# Altium PCB Bento Pad V1.0_PCB.PcbDoc (part 3 of 3)
Units mil, origin at the board's own origin, x right, y up, seen from the top; angles counter-clockwise.
Board outline 10000 x 3200 mil, 2 copper layers (Top Layer, Bottom Layer), stack 61.811 mil thick; 125 components, 53 nets, 479 pads, 91 vias.
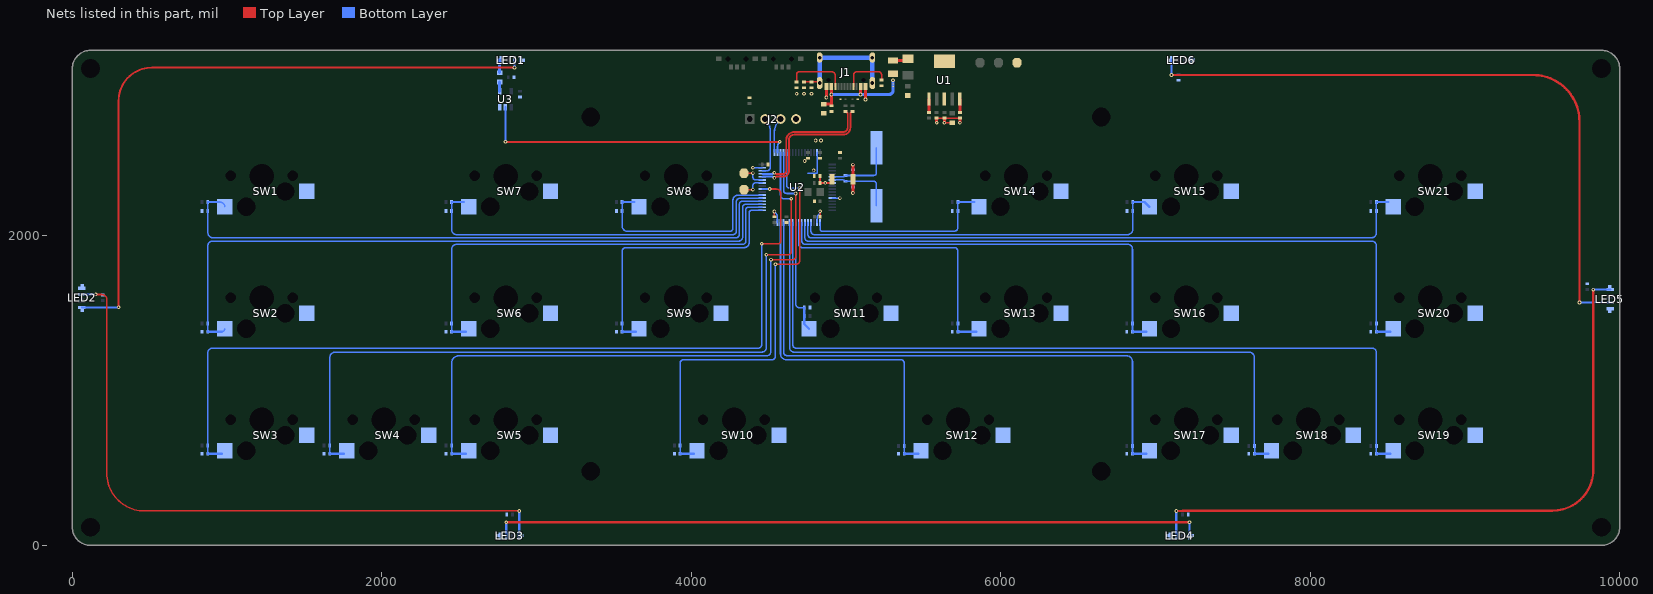
[diagram p2: the nets of this part, all layers, seen from the top]

## Via types
v1: diameter 23.62, hole 11.81, Top Layer to Bottom Layer, tented both sides, 91 vias

## Nets (pads, with @x,y where several pads share a name; then routed paths per layer and width w, separated by ;. In a path a pad name is that pad's centre, name@x,y a point inside that pad or via, vN(x,y) a via of type N, cw(c..) or ccw(c..) an arc to the next point about the centre after c; other vN are vias at no path point) (continued)
GND: C1.1 C2.2 C3.2 C4.1 C5.1 C6.1 C7.1 C8.1 C9.2 C10.2 C11.2 C12.2 C13.1 C14.2 C15.1 C16.2 C17.1 C18.1 C19.1 C20.1 C21.1 C22.1 C23.1 C24.1 C25.1 C26.1 C27.1 C28.1 C29.1 C30.1 C31.1 C32.1 C33.1 C34.1 C35.1 C36.1 C37.1 C38.1 C39.1 C40.1 C41.1 C42.1 C43.1 C44.2 C45.1 C46.1 D1.2 D2.2 D3.2 J1.A1/B12 J1.B1/A12 J2.4 LED1.4 LED2.4 LED3.4 LED4.4 LED5.4 LED6.4 P3.1 R1.2 R2.2 R3.2 R9.2 R10.1 SW1.1 SW2.1 SW3.1 SW4.1 SW5.1 SW6.1 SW7.1 SW8.1 SW9.1 SW10.1 SW11.1 SW12.1 SW13.1 SW14.1 SW15.1 SW16.1 SW17.1 SW18.1 SW19.1 SW20.1 SW21.1 SW22.2 U1.3 U1.6 U2.12 U2.18 U2.31 U2.47 U2.63 U3.3 | length 1221.9
  Top Layer w10: C11.2@4537.4,2124.09 v1(4537.4,2158) ; C9.2@4832.68,2124.09 v1(4832.68,2159.92) ; J1.B1/A12@4873.65,2965.62 J1.B1/A12@4874.02,2965.98 ; C5.1@5586,2761.75 C5.1@5593.5,2761.75 ; C5.1@5593.5,2760.75 C7.1@5736,2760.75 ; v1(5636,2732.25) C8.1@5686,2732.25
  Top Layer w20: v1@4873.64,2895 J1.B1/A12@4873.64,2965.61 ; v1(5044.71,2278.03) SW22.2@5044.71,2366.01 v1(5044.71,2461.1) ; v1(5125.99,2882.19) J1.A1/B12@5125.98,2965.98 ; v1(5586,2732.25) C5.1@5586,2758.75 ; v1(5636,2732.25) C6.1@5636,2758.75 ; v1(5736,2732.25) C7.1@5736,2758.75
  Bottom Layer w10: LED3.4@2764.73,61.5 LED3.4@2765,61.5 ; v1(4398.48,2441.42) U2.47@4458.66,2441.42 ; v1(4537.4,2158) 4547.24,2148.16 cw(c4523.48,2124.4) 4557.09,2124.4 U2.31@4557.09,2087.09 ; 4753.94,2404.33 4812.99,2404.33 U2.63@4812.99,2539.84 ; U2.18@4812.99,2087.09 4812.99,2128.04 4830.07,2145.12 4830.07,2157.31 v1(4832.68,2159.92) ; U2.12@4911.42,2244.57 v1(4960.33,2244.57) ; v1(5044.71,2278.03) C15.1@5044.71,2317.02 ; C13.1@5044.71,2428.02 v1(5044.71,2461.1)
  other v1: 4790.68,2423.96 4732.73,2484.19 4803.6,2616.73 4838.27,2616.73 4873.27,2895 4680.82,2919.65 4728.9,2919.65 4776.9,2919.65
LDO_EN: R6.1 U1.1 | length 83.8
  Top Layer w20: R6.1@5536,2802.12 U1.1@5536,2885.95
LED_DO_3V3: U2.50 U3.2 | length 2070.3
  Top Layer w12: v1(2799.5,2608.5) 4571.5,2608.5 v1(4572,2609)
  Bottom Layer w12: U3.2@2798.86,2832.64 2799.18,2832.32 2799.18,2608.82 v1(2799.5,2608.5) ; U2.50@4557.09,2539.84 4557.09,2573 cw(c4608,2573) 4563.05,2596.9 cw(c4608,2573) v1(4572,2609)
LED_DO_5V0: R33.1 U3.4 | length 60.5
  Bottom Layer w20: U3.4@2761.46,2935 R33.1@2761.46,2995.53
NetC1_2: C1.2 J1.S1 J1.S2 J1.S3 J1.S4 R1.1 | length 780.2
  Top Layer w10: R1.1@4728.9,2995.35 4812.8,2995.35 cw(c4812.8,2978.43) J1.S1@4829.72,2978.43
  Bottom Layer w30: J1.S1@4829.72,2988.43 J1.S2@4829.72,3152.99 J1.S3@5170.28,3152.99 J1.S4@5170.28,2988.43
NetC7_2: C7.2 U1.5 | length 84.1
  Top Layer w20: C7.2@5736,2801.89 U1.5@5736,2885.95
NetF1_2: F1.2 FB1.1 | length 101.8
  Top Layer w20: F1.2@5304,3135.31 5389.76,3135.31 ccw(c5389.76,3145.54) FB1.1@5400,3145.54
NetJ1_A5: J1.A5 R2.1 | length 311.8
  Top Layer w10: J1.A5@5049.21,2965.98 5049.21,3040.21 cw(c5071.01,3040.21) 5071.01,3062.01 5208.61,3062.01 cw(c5208.61,3040.62) 5230,3040.62 R2.1@5230,3008.5
NetJ1_B5: J1.B5 R3.1 | length 393.9
  Top Layer w10: R3.1@4680.82,2995.35 4680.82,3043 cw(c4699.83,3043) 4699.83,3062.01 4905.51,3062.01 cw(c4905.51,3036.52) 4931,3036.52 4931,3019 4931.1,3019 J1.B5@4931.1,2965.98
NetLED1_1: LED1.1 R33.2 | length 92.8
  Bottom Layer w10: LED1.1@2761.5,3135.47 cw(c2764.53,3135.47) 2764.53,3138.5 LED1.1@2772.64,3138.5
  Bottom Layer w20: R33.2@2761.5,3055.56 LED1.1@2761.5,3135.47
NetLED1_3: LED1.3 LED2.1 | length 4303.7
  Top Layer w12: v1(299.31,1539) 299.31,2873.72 cw(c513.6,2873.72) 513.6,3088 v1(2857.28,3088)
  Bottom Layer w12: LED2.1@61.5,1537.99 62,1538.5 298.81,1538.5 v1(299.31,1539) ; v1(2857.28,3088) LED1.3@2857.28,3138.5
NetLED2_3: LED2.3 LED3.1 | length 4269.8
  Top Layer w10: v1(151.5,1622.64) ccw(c152.35,1622.64) 152.35,1621.78 191.14,1621.78 cw(c191.14,1589.92) 223,1589.92 223,466.73 ccw(c466.54,466.73) 466.54,223.19 v1(2888.75,223.19)
  Bottom Layer w15: LED2.3@61.5,1622.64 v1(151.5,1622.64) ; LED3.1@2888.75,61.5 v1(2888.75,223.19)
NetLED3_3: LED3.3 LED4.1 | length 4592.2
  Top Layer w15: v1(2804.1,149.85) v1(7219.45,149.85) v1@7219.45,150
  Bottom Layer w15: LED3.3@2804.1,61.5 v1(2804.1,149.85) ; LED4.1@7219.45,61.5 v1(7219.45,149.85)
NetLED4_3: LED4.3 LED5.1 | length 4281
  Top Layer w15: v1(7134.81,223.19) 7175.97,224.99 cw(c7176.62,210) 7176.62,225 9565.55,225 ccw(c9565.55,488.78) 9829.33,488.78 v1(9829.33,1653.57)
  Bottom Layer w15: LED4.3@7134.81,61.5 v1(7134.81,223.19) ; v1(9829.33,1653.57) 9829.6,1653.83 9938.24,1653.83 LED5.1@9938.5,1654.1
NetLED5_3: LED5.3 LED6.1 | length 4275.3
  Top Layer w15: v1(7103.35,3040.15) 9440.43,3040.15 cw(c9440.43,2740.58) 9740,2740.58 v1(9740,1570)
  Bottom Layer w15: v1(7103.35,3040.15) LED6.1@7103.35,3138.5 ; v1(9740,1570) 9740.27,1569.73 9938.23,1569.73 LED5.3@9938.5,1569.45
OSC_IN: C13.2 R7.1 U2.5 X1.1 | length 458.9
  Bottom Layer w10: U2.5@4911.42,2382.36 4976.81,2382.36 ccw(c4976.81,2411.92) R7.1@4997.71,2391.02 C13.2@5044.71,2391.02 5178.91,2391.02 ccw(c5178.91,2408.96) 5196.85,2408.96 X1.1@5196.85,2569.84
OSC_OUT: C15.2 R7.2 U2.6 X1.2 | length 437.6
  Bottom Layer w10: U2.6@4911.42,2362.68 4976.81,2362.68 cw(c4976.81,2333.12) R7.2@4997.71,2354.02 C15.2@5044.71,2354.02 5177.41,2354.02 cw(c5177.41,2334.58) 5196.85,2334.58 X1.2@5196.85,2195.83
RST: C16.1 R8.1 SW22.1 U2.7 | length 188.5
  Top Layer w15: C16.1@4831.49,2388.27 R8.1@4831.49,2342.99 4902.21,2342.99 4910.85,2351.63 SW22.1@4910.85,2366.01
  Bottom Layer w10: v1(4865.48,2342.99) U2.7@4911.42,2342.99
RX: P5.1 U2.43 | length 154.5
  Top Layer w10: P5.1@4341,2405.68 4341,2406.05 v1(4398.48,2406.05)
  Bottom Layer w10: v1(4398.48,2406.05) 4398.48,2378.76 ccw(c4414.56,2378.76) 4414.56,2362.68 U2.43@4458.66,2362.68
SW#1: C23.2 R13.2 SW1.2 U2.36 | length 4143.9
  Bottom Layer w10: R13.2@876,2219.22 C23.2@876,2161.22 876,2022.51 ccw(c910.36,2022.51) 910.36,1988.15 4287.2,1988.15 ccw(c4287.2,2012.17) 4311.22,2012.17 4311.22,2205.2 cw(c4330.91,2205.2) 4330.91,2224.88 U2.36@4458.66,2224.88 ; SW1.2@954.21,2219.22 cw(c954.21,2188.19) SW1.2@985.24,2188.19
  Bottom Layer w15: R13.2@876,2219.22 SW1.2@954.21,2219.22
SW#2: C24.2 R14.2 SW2.2 U2.35 | length 4494.6
  Bottom Layer w10: C24.2@876,1381 R14.2@876,1434 876,1936.23 cw(c906.99,1936.23) 906.99,1967.22 4307.51,1967.22 ccw(c4307.51,1991.86) 4332.15,1991.86 4332.15,2185.51 cw(c4351.83,2185.51) 4351.83,2205.2 U2.35@4458.66,2205.2 ; SW2.2@966.24,1381 ccw(c966.24,1400) SW2.2@985.24,1400
  Bottom Layer w15: C24.2@876,1381 SW2.2@966.24,1381
SW#3: C25.2 R15.2 SW3.2 U2.40 | length 5581.3
  Top Layer w10: v1(4455,1950) 4562,1950 ccw(c4562,1966) 4578,1966 4578,2275.44 ccw(c4549.9,2275.44) 4549.9,2303.54 v1(4507.64,2303.54)
  Bottom Layer w10: C25.2@875.98,592.81 R15.2@875.98,645 875.98,1245.98 cw(c905,1245.98) 905,1275 4432.31,1275 ccw(c4432.31,1297.69) 4455,1297.69 v1(4455,1950) ; U2.40@4458.66,2303.62 4507.64,2303.62 v1(4507.64,2303.54)
  Bottom Layer w15: C25.2@875.98,592.81 SW3.2@966.22,592.81
SW#4: C26.2 R16.2 SW4.2 U2.51 | length 5043.7
  Top Layer w10: v1(4485.45,1878.27) 4625.45,1878.27 ccw(c4625.45,1899.55) 4646.73,1899.55 v1(4646.73,2241.1)
  Bottom Layer w10: C26.2@1664.17,592.81 R16.2@1664.17,645 1664.17,1214.17 cw(c1700,1214.17) 1700,1250 4456.07,1250 ccw(c4456.07,1279.38) 4485.45,1279.38 v1(4485.45,1878.27) ; U2.51@4576.77,2539.84 4576.77,2262.03 ccw(c4597.7,2262.03) 4597.7,2241.1 v1(4646.73,2241.1)
  Bottom Layer w15: C26.2@1664.17,592.81 SW4.2@1754.4,592.81
SW#5: C27.2 R11.2 SW5.2 U2.52 | length 4287.2
  Top Layer w10: v1(4515,1847.16) 4657.16,1847.16 ccw(c4657.16,1864.27) 4674.27,1864.27 v1(4674.27,2274.57)
  Bottom Layer w10: C27.2@2452.36,592.81 R11.2@2452.36,645 2452.36,1182.36 cw(c2495,1182.36) 2495,1225 4485.33,1225 ccw(c4485.33,1254.67) 4515,1254.67 v1@4515,1844.16 ; U2.52@4596.46,2539.84 4596.46,2294.25 ccw(c4616.14,2294.25) 4616.14,2274.57 v1(4674.27,2274.57)
  Bottom Layer w15: C27.2@2452.36,592.81 SW5.2@2542.59,592.81
SW#6: C28.2 R17.2 SW6.2 U2.34 | length 2879.9
  Bottom Layer w10: C28.2@2451.38,1375 C28.2@2451.38,1381 R17.2@2451.38,1434 2451.38,1914.38 cw(c2483.3,1914.38) 2483.3,1946.3 4333.21,1946.3 ccw(c4333.21,1966.17) 4353.07,1966.17 4353.07,2171.73 cw(c4366.85,2171.73) 4366.85,2185.51 U2.34@4458.66,2185.51
  Bottom Layer w15: C28.2@2452.38,1381 SW6.2@2542.61,1381
SW#7: C29.2 R12.2 SW7.2 U2.37 | length 2497.8
  Bottom Layer w10: R12.2@2451.38,2219.22 C29.2@2451.38,2161.22 2451.38,2041.21 ccw(c2483.51,2041.21) 2483.51,2009.07 4270.34,2009.07 ccw(c4270.34,2029.04) 4290.3,2029.04 4290.3,2218.98 cw(c4315.89,2218.98) 4315.89,2244.57 U2.37@4458.66,2244.57
  Bottom Layer w15: R12.2@2452.38,2219.22 SW7.2@2530.59,2219.22
SW#8: C30.2 R18.2 SW8.2 U2.38 | length 1377.1
  Bottom Layer w10: R18.2@3552.96,2226.76 R18.2@3552.96,2219.22 C30.2@3552.96,2161.22 3552.96,2064.93 ccw(c3587.89,2064.93) 3587.89,2030 4249.68,2030 ccw(c4249.68,2049.69) 4269.37,2049.69 4269.37,2230.79 cw(c4302.84,2230.79) 4302.84,2264.25 U2.38@4458.66,2264.25
  Bottom Layer w15: R18.2@3552.96,2219.22 SW8.2@3631.17,2219.22
SW#9: C31.2 R19.2 SW9.2 U2.33 | length 1749.7
  Bottom Layer w10: C31.2@3552.96,1381 R19.2@3552.96,1434 3552.96,1900.19 cw(c3578.15,1900.19) 3578.15,1925.37 4342.6,1925.37 ccw(c4342.6,1956.77) 4374,1956.77 4374,2150.02 cw(c4389.81,2150.02) 4389.81,2165.83 U2.33@4458.66,2165.83
  Bottom Layer w15: C31.2@3552.96,1381 SW9.2@3643.2,1381
SW#10: C32.2 R20.2 SW10.2 U2.53 | length 2852.5
  Top Layer w10: v1(4544.14,1817.35) 4676.96,1817.35 ccw(c4676.96,1841.47) 4701.08,1841.47 v1(4701.08,2309.92)
  Bottom Layer w10: C32.2@3927.94,592.81 R20.2@3927.94,645 3927.94,1177.94 cw(c3950,1177.94) 3950,1200 4520,1200 ccw(c4520,1224.14) 4544.14,1224.14 v1(4544.14,1817.35) ; U2.53@4616.14,2539.84 4616.14,2327.72 ccw(c4633.94,2327.72) 4633.94,2309.92 v1@4696.08,2309.92
  Bottom Layer w15: C32.2@3927.94,592.81 SW10.2@4018.18,592.81
SW#11: C33.2 R26.2 SW11.2 U2.25 | length 745.3
  Bottom Layer w10: U2.25@4675.2,2087.09 4675.2,1561.8 ccw(c4701,1561.8) 4701,1536 4728.67,1536 ccw(c4728.67,1537.11) C33.2@4729.78,1537.11
  Bottom Layer w15: C33.2@4729.78,1537.11 R26.2@4729.78,1484.11 4729.78,1431.38 SW11.2@4761.16,1400
SW#12: C34.2 R27.2 SW12.2 U2.30 | length 2354.4
  Bottom Layer w10: U2.30@4576.77,2087.09 4576.77,1237.46 ccw(c4613.23,1237.46) 4613.19,1201 ; 4613.23,1201 5353.92,1201 cw(c5353.92,1178.94) 5375.98,1178.94 R27.2@5375.98,646 ; C34.2@5375.98,593.81 R27.2@5375.98,642.81
  Bottom Layer w15: C34.2@5375.98,592.81 SW12.2@5466.22,592.81
SW#13: C35.2 R28.2 SW13.2 U2.24 | length 1833.2
  Bottom Layer w10: U2.24@4694.88,2087.09 4694.88,1946.3 ccw(c4715.81,1946.3) 4715.81,1925.37 4864.94,1925.37 5699.02,1925.37 cw(c5699.02,1901.39) 5723,1901.39 R28.2@5723,1434 C35.2@5723,1381
  Bottom Layer w15: C35.2@5723,1381 SW13.2@5841.24,1381
SW#14: C36.2 R23.2 SW14.2 U2.17 | length 1225.7
  Bottom Layer w10: U2.17@4832.68,2087.09 4832.68,2044.68 ccw(c4847.36,2044.68) 4847.36,2030 4873.42,2030 5656.71,2030 5697.82,2030 ccw(c5697.82,2055.18) 5723,2055.18 R23.2@5723,2219.22
  Bottom Layer w15: R23.2@5723,2219.22 5724.41,2219.22 SW14.2@5829.21,2219.22
SW#15: C37.2 R21.2 SW15.2 U2.20 | length 2465.4
  Bottom Layer w10: U2.20@4773.62,2087.09 4773.62,2030 ccw(c4794.55,2030) 4794.55,2009.07 4838.58,2009.07 6820.45,2009.07 ccw(c6820.45,2041.21) 6852.58,2041.21 C37.2@6852.58,2161.22 R21.2@6852.58,2219.22
  Bottom Layer w15: R21.2@6852.58,2219.22 6929.79,2219.22 SW15.2@6960.82,2188.19
SW#16: C38.2 R24.2 SW16.2 U2.23 | length 2911.1
  Bottom Layer w10: U2.23@4714.57,2087.09 4714.57,1967.22 ccw(c4735.49,1967.22) 4735.49,1946.3 4856.45,1946.3 6820.66,1946.3 cw(c6820.66,1915.38) 6851.58,1915.38 R24.2@6851.58,1434 C38.2@6851.58,1381
  Bottom Layer w15: C38.2@6851.58,1381 SW16.2@6941.82,1381
SW#17: C39.2 R22.2 SW17.2 U2.29 | length 3812.7
  Bottom Layer w10: 4596.46,1252.24 ccw(c4623.7,1252.24) 4623.7,1225 6816,1225 cw(c6816,1189.44) 6851.56,1189.44 R22.2@6851.56,642.81 C39.2@6851.56,592.81 ; 4596.46,1252.29 U2.29@4596.46,2087.09
  Bottom Layer w15: C39.2@6851.56,592.81 SW17.2@6941.8,592.81
SW#18: C40.2 R29.2 SW18.2 U2.27 | length 4560.6
  Bottom Layer w10: 4635.83,1277.22 ccw(c4663.5,1277.22) 4666.33,1249.69 4669.33,1250 7603.92,1250 cw(c7603.92,1214.15) 7639.77,1214.15 R29.2@7639.77,642.81 ; 4635.83,1277.26 U2.27@4635.83,2087.09 ; C40.2@7640.79,592.81 R29.2@7640.79,642.81
  Bottom Layer w15: C40.2@7640.79,592.81 SW18.2@7730.01,592.81
SW#19: C41.2 R30.2 SW19.2 U2.26 | length 5334.6
  Bottom Layer w10: 4655.51,1297.91 ccw(c4678.43,1297.91) 4678.43,1275 8398.92,1275 cw(c8398.92,1245.98) 8427.94,1245.98 R30.2@8427.94,641.81 C41.2@8427.94,592.81 ; 4655.51,1297.96 U2.26@4655.51,2087.09
  Bottom Layer w15: C41.2@8427.94,592.81 SW19.2@8518.18,592.81
SW#20: C42.2 R31.2 SW20.2 U2.22 | length 4467.7
  Bottom Layer w10: U2.22@4734.25,2087.09 4734.25,1988.15 ccw(c4755.18,1988.15) 4755.18,1967.22 4856.45,1967.22 8396.97,1967.22 cw(c8396.97,1936.23) 8427.96,1936.23 R31.2@8427.96,1434 C42.2@8427.96,1381
  Bottom Layer w15: C42.2@8427.96,1381 SW20.2@8518.2,1381
SW#21: C43.2 R25.2 SW21.2 U2.21 | length 4052.5
  Bottom Layer w10: U2.21@4753.94,2087.09 4753.94,2009.07 ccw(c4774.86,2009.07) 4774.86,1988.15 4856.45,1988.15 8393.6,1988.15 ccw(c8393.6,2022.51) 8427.96,2022.51 C43.2@8427.96,2161.22 R25.2@8427.96,2213.22
  Bottom Layer w15: R25.2@8427.96,2219.22 SW21.2@8506.17,2219.22
SWDCLK: J2.3 U2.49 | length 228.3
  Bottom Layer w10: U2.49@4537.4,2539.84 4537.4,2674.48 cw(c4637.4,2674.48) 4566.69,2745.19 J2.3@4577.4,2755.91
SWDIO: J2.2 U2.46 | length 386.1
  Bottom Layer w10: U2.46@4458.66,2421.73 4490,2421.73 ccw(c4490,2441.73) 4510,2441.73 4510,2681.89 ccw(c4410,2681.89) 4480.71,2752.6 J2.2@4477.4,2755.91
TX: P4.1 U2.42 | length 154.5
  Top Layer w10: P4.1@4341,2299.25 4398.48,2299.25 v1(4398.48,2299.62)
  Bottom Layer w10: v1(4398.48,2299.62) 4398.48,2326.91 cw(c4414.56,2326.91) 4414.56,2342.99 U2.42@4458.66,2342.99
USB_D_N: R4.2 U2.44 | length 951.5
  Top Layer w12: v1(4537.4,2375.39) 4545.74,2381.43 cw(c4552.78,2371.7) 4552.78,2383.7 4572,2383.7 4594.79,2383.7 ccw(c4594.79,2419.91) 4631,2419.91 4631,2620.1 cw(c4665.9,2620.1) 4665.9,2655 4982,2655 ccw(c4982,2701.13) 5028.13,2701.13 5028.13,2786.09 cw(c5047.17,2786.09) 5033.71,2799.55 cw(c5037.22,2796.04) 5037.22,2801 ccw(c5037.22,2805.96) 5040.72,2802.45 R4.2@5042.27,2804
  Bottom Layer w12: U2.44@4458.66,2382.36 4458.76,2382.41 cw(c4464.18,2371.7) 4464.18,2383.7 ccw(c4464.18,2400.7) 4464.26,2383.7 4522.03,2383.7 cw(c4522.03,2371.7) 4529.06,2381.43 v1(4537.4,2375.39)
USB_D_P: R5.2 U2.45 | length 924.8
  Top Layer w12: v1(4537.4,2409.02) 4545.74,2402.98 ccw(c4552.78,2412.7) 4552.78,2400.7 cw(c4552.78,2383.7) 4552.83,2400.7 4594.7,2400.7 ccw(c4594.7,2420) 4614,2420 4614,2620.1 cw(c4665.9,2620.1) 4665.9,2672 4982,2672 ccw(c4982,2701.13) 5011.13,2701.13 5011.13,2786.09 ccw(c4992.09,2786.09) 5005.56,2799.55 ccw(c5002.05,2796.04) 5002.05,2801 cw(c5002.05,2805.96) 4998.54,2802.45 R5.2@4996.99,2804
  Bottom Layer w12: U2.45@4458.66,2402.05 U2.45@4458.66,2402.05 ccw(c4464.18,2412.7) 4464.18,2400.7 4522.03,2400.7 ccw(c4522.03,2412.7) 4529.06,2402.98 v1(4537.4,2409.02)
VBUS: C2.1 C3.1 D1.1 F1.1 J1.A4/B9 J1.B4/A9 | length 700.8
  Top Layer w10: v1(5094.17,2914) v1@5094.49,2914
  Top Layer w20: C2.1@4855.77,2852.5 4903.18,2852.5 ; C3.1@4905.51,2843.16 J1.B4/A9@4905.51,2965.98 ; v1@5094.49,2914 J1.A4/B9@5094.49,2965.98
  Bottom Layer w20: v1(4905.77,2914) v1(5094.17,2914) 5276,2914 ccw(c5276,2942) 5304,2942 v1(5304,3006.11)
pads on no net: J1.A8 J1.B8 J1.MH LED6.3 SW1. SW2. SW3. SW4. SW5. SW6. SW7. SW8. SW9. SW10. SW11. SW12. SW13. SW14. SW15. SW16. SW17. SW18. SW19. SW20. SW21. SW23.2 SW23.4 SW23.5 SW23.MH SW24.2 SW24.4 SW24.5 SW24.MH U2.2 U2.3 U2.4 U2.8 U2.9 U2.10 U2.11 U2.14 U2.15 U2.16 U2.39 U2.41 U2.54 U2.55 U2.56 U2.57 U2.58 U2.59 U2.61 U2.62 U3.1

## Polygon pours and split planes (outlines as drawn)
GND on Top Layer "NONET_L-01_P-001" (solid, pour order 0): 0,118 0,3082 cw(c118,3082) 118,3200 9882,3200 cw(c9882,3082) 10000,3082 10000,118 cw(c9882,118) 9882,0 118,0 cw(c118,118)
GND on Bottom Layer "NONET_L-01_P-001" (solid, remove dead copper, pour order 1): 0,118 0,3082 cw(c118,3082) 118,3200 9882,3200 cw(c9882,3082) 10000,3082 10000,118 cw(c9882,118) 9882,0 118,0 cw(c118,118)

## Other copper
Top Layer:
  rectangle net NetF1_2: 5270.54,3115.62 5435.83,3173.1
  region net VBUS: 5270.54,3068.38 5337.46,3068.38 5337.46,2977.94 5270.54,2977.94
  region net GND: 5362.5,2970.06 5362.5,2933 5240.54,2933 5240.54,2970.06
  region net GND: 4861.68,2193.07 4823.99,2193.07 cw(c4823.99,2212.38) 4804.68,2212.38 4804.68,2237.38 4786.68,2237.38 4786.68,2212.05 ccw(c4816.35,2212.05) 4816.35,2182.38 4851.68,2182.38 ccw(c4851.68,2192.38) 4861.68,2192.38
  region net GND: 6127.5,3179.61 6127.5,3169.18 5801.59,3169.18 5801.59,3179.61
  region net GND: 5299.28,2966.13 5308.72,2966.13 5308.72,2942 5299.28,2942
  region net 3V3: 930.54,1122.03 cw(c980.54,1122.03) 980.54,1172.03 1485.61,1172.03 cw(c1485.61,1122.03) 1535.61,1122.03 1535.61,685.22 ccw(c1585.61,685.22) 1585.61,635.22 1668.73,635.22 ccw(c1668.73,685.22) 1718.73,685.22 1718.73,1122.03 cw(c1768.73,1122.03) 1768.73,1172.03 2273.8,1172.03 cw(c2273.8,1122.03) 2323.8,1122.03 2323.8,685.22 ccw(c2373.8,685.22) 2373.8,635.22 2456.92,635.22 ccw(c2456.92,685.22) 2506.92,685.22 2506.92,1122.03 cw(c2556.92,1122.03) 2556.92,1172.03 3749.38,1172.03 cw(c3749.38,1122.03) 3799.38,1122.03 3799.38,685.22 ccw(c3849.38,685.22) 3849.38,635.22 3932.5,635.22 ccw(c3932.5,685.22) 3982.5,685.22 3982.5,1122.03 cw(c4032.5,1122.03) 4032.5,1172.03 5195.23,1172.03 cw(c5195.23,1119.84) 5247.42,1119.84 5247.42,683.03 ccw(c5297.42,683.03) 5297.42,633.03 5380.54,633.03 ccw(c5380.54,683.03) 5430.54,683.03 5430.54,1119.84 cw(c5480.54,1119.84) 5480.54,1169.84 6673,1169.84 cw(c6673,1119.84) 6723,1119.84 6723,683.03 ccw(c6773,683.03) 6773,633.03 6856.12,633.03 ccw(c6856.12,683.03) 6906.12,683.03 6906.12,1119.84 cw(c6956.12,1119.84) 6956.12,1169.84 7461.21,1169.84 cw(c7461.21,1119.84) 7511.21,1119.84 7511.21,683.03 ccw(c7561.21,683.03) 7561.21,633.03 7644.33,633.03 ccw(c7644.33,683.03) 7694.33,683.03 7694.33,1119.84 cw(c7744.33,1119.84) 7744.33,1169.84 8248.38,1169.84 cw(c8248.38,1118.84) 8299.38,1118.84 8299.38,682.03 ccw(c8349.38,682.03) 8349.38,632.03 8427.94,632.03 ccw(c8427.94,686.61) 8482.52,686.61 8482.52,2287 ccw(c8432.52,2287) 8432.52,2337 8349.4,2337 ccw(c8349.4,2287) 8299.4,2287 8299.4,1325.18 cw(c8249.4,1325.18) 8249.4,1275.18 6957.14,1275.18 cw(c6957.14,1325.18) 6907.14,1325.18 6907.14,2287 ccw(c6857.14,2287) 6857.14,2337 6774.02,2337 ccw(c6774.02,2287) 6724.02,2287 6724.02,1325.18 cw(c6674.02,1325.18) 6674.02,1275.18 5827.56,1275.18 cw(c5827.56,1325.18) 5777.56,1325.18 5777.56,2287 ccw(c5727.56,2287) 5727.56,2337 5644.44,2337 ccw(c5644.44,2287) 5594.44,2287 5594.44,1325.18 cw(c5544.44,1325.18) 5544.44,1275.18 3657.52,1275.18 cw(c3657.52,1325.18) 3607.52,1325.18 3607.52,2287 ccw(c3557.52,2287) 3557.52,2337 3474.4,2337 ccw(c3474.4,2287) 3424.4,2287 3424.4,1325.18 cw(c3374.4,1325.18) 3374.4,1275.18 2555.94,1275.18 cw(c2555.94,1325.18) 2505.94,1325.18 2505.94,2287 ccw(c2455.94,2287) 2455.94,2337 2372.82,2337 ccw(c2372.82,2287) 2322.82,2287 2322.82,1325.18 cw(c2272.82,1325.18) 2272.82,1275.18 980.56,1275.18 cw(c980.56,1325.18) 930.56,1325.18 930.56,2287 ccw(c880.56,2287) 880.56,2337 797.44,2337 ccw(c797.44,2287) 747.44,2287 747.44,685.22 747.42,685.22 ccw(c797.42,685.22) 797.42,635.22 875.98,635.22 ccw(c875.98,689.78) 930.54,689.78
Bottom Layer:
  region net GND: 4818.9,2508.63 4867.8,2508.63 4867.8,2480.63 4807.09,2480.63 4807.09,2736.03 4818.9,2736.03
Multi-Layer:
  pour cut-out: 6531.1,480 ccw(c6649.21,480) 6649.21,361.89 ccw(c6649.21,480) 6767.32,480 ccw(c6649.21,480) 6649.21,598.11 ccw(c6649.21,480)
  pour cut-out: 3468.82,480 cw(c3350.71,480) 3350.71,361.89 cw(c3350.71,480) 3232.6,480 cw(c3350.71,480) 3350.71,598.11 cw(c3350.71,480)
  pour cut-out: 3468.82,2770 ccw(c3350.71,2770) 3350.71,2888.11 ccw(c3350.71,2770) 3232.6,2770 ccw(c3350.71,2770) 3350.71,2651.89 ccw(c3350.71,2770)
  pour cut-out: 6767.42,2770 ccw(c6649.31,2770) 6649.31,2888.11 ccw(c6649.31,2770) 6531.2,2770 ccw(c6649.31,2770) 6649.31,2651.89 ccw(c6649.31,2770)
  pour cut-out: 118,3200.11 ccw(c118,3082) -0.11,3082 ccw(c118,3082) 118,2963.89 ccw(c118,3082) 236.11,3082 ccw(c118,3082)
  pour cut-out: 10000.11,3082 ccw(c9882,3082) 9882,3200.11 ccw(c9882,3082) 9763.89,3082 ccw(c9882,3082) 9882,2963.89 ccw(c9882,3082)
  pour cut-out: 9882,-0.11 ccw(c9882,118) 10000.11,118 ccw(c9882,118) 9882,236.11 ccw(c9882,118) 9763.89,118 ccw(c9882,118)
  pour cut-out: -0.11,118 ccw(c118,118) 118,-0.11 ccw(c118,118) 236.11,118 ccw(c118,118) 118,236.11 ccw(c118,118)

## Silkscreen, mask and mechanical layers (free items; w line width, h text height)
Top Overlay:
  lines w10: 5744.67,2696.81 5744.67,2033.86 6453.33,2033.86 6453.33,2742.52 5801.83,2742.52 ; 869.65,457.48 1578.31,457.48 1578.31,1166.14 869.65,1166.14 869.65,457.48 ; 869.67,1245.67 1578.33,1245.67 1578.33,1954.33 869.67,1954.33 869.67,1245.67 ; 869.67,2033.86 1578.33,2033.86 1578.33,2742.52 869.67,2742.52 869.67,2033.86 ; 1657.84,457.48 2366.5,457.48 2366.5,1166.14 1657.84,1166.14 1657.84,457.48 ; 2446.03,457.48 3154.69,457.48 3154.69,1166.14 2446.03,1166.14 2446.03,457.48 ; 2446.05,1245.67 3154.71,1245.67 3154.71,1954.33 2446.05,1954.33 2446.05,1245.67 ; 2446.05,2033.86 3154.71,2033.86 3154.71,2742.52 2446.05,2742.52 2446.05,2033.86 ; 3546.63,1245.67 4255.29,1245.67 4255.29,1954.33 3546.63,1954.33 3546.63,1245.67 ; 3546.63,2033.86 4255.29,2033.86 4255.29,2742.52 3546.63,2742.52 3546.63,2033.86 ; 3921.61,457.48 4630.27,457.48 4630.27,1166.14 3921.61,1166.14 3921.61,457.48 ; 4645.59,1245.67 5354.25,1245.67 5354.25,1954.33 4645.59,1954.33 4645.59,1245.67 ; 5369.65,457.48 6078.31,457.48 6078.31,1166.14 5369.65,1166.14 5369.65,457.48 ; 5744.67,1245.67 6453.33,1245.67 6453.33,1954.33 5744.67,1954.33 5744.67,1245.67 ; 6845.23,457.48 7553.89,457.48 7553.89,1166.14 6845.23,1166.14 6845.23,457.48 ; 6845.25,1245.67 7553.91,1245.67 7553.91,1954.33 6845.25,1954.33 6845.25,1245.67 ; 6845.25,2033.86 7553.91,2033.86 7553.91,2742.52 6845.25,2742.52 6845.25,2033.86 ; 7633.44,457.48 8342.1,457.48 8342.1,1166.14 7633.44,1166.14 7633.44,457.48 ; 8421.61,457.48 9130.27,457.48 9130.27,1166.14 8421.61,1166.14 8421.61,457.48 ; 8421.63,2033.86 9130.29,2033.86 9130.29,2742.52 8421.63,2742.52 8421.63,2033.86 ; 8425.2,1238.16 9133.86,1238.16 9133.86,1946.82 8425.2,1946.82 8425.2,1238.16
  text "Bento Pad V1.0" at 3136.45,3096.79 h60
  text "BOOT-1" at 4185.94,3020.7 h60
  text "BOOT-0" at 4479,3020.7 h60
  text "GND" at 6119.98,2955.66 h60 r90
  text "5V0" at 5891.21,2945.66 h60 r90
  text "3V3" at 6011.44,2945.66 h60 r90
  text "RX" at 4419.32,2391.05 h60
  text "RESET" at 5090,2350.5 h60
  text "TX" at 4419.32,2284.61 h60
Board outline:
  the board outline again, w10
Fabrication:
  drawing of 191 lines, arcs and shapes, not listed
  text "Layer" at 10710.58,3080 h60
  text "Name" at 11120.49,3080 h60
  text "Material" at 12050.23,3080 h60
  text "Thickness" at 12910,3080 h60
  text "Constant" at 13559.84,3080 h60
  text "Board Layer Stack" at 14129.7,3080 h60
  text "Top Overlay" at 11120.49,2960 h60
  text "Top Solder" at 11120.49,2840 h60
  text "Solder Resist" at 12050.23,2840 h60
  text "0.010mm" at 12910,2840 h60
  text "4" at 13559.84,2840 h60
  text "1" at 10710.58,2720 h60
  text "Top Layer" at 11120.49,2720 h60
  text "0.035mm" at 12910,2720 h60
  text "Dielectric 1" at 11120.49,2600 h60
  text "FR-4" at 12050.23,2600 h60
  text "1.500mm" at 12910,2600 h60
  text "4.8" at 13559.84,2600 h60
  text "2" at 10710.58,2480 h60
  text "Bottom Layer" at 11120.49,2480 h60
  text "0.035mm" at 12910,2480 h60
  text "Bottom Solder" at 11120.49,2360 h60
  text "Solder Resist" at 12050.23,2360 h60
  text "0.010mm" at 12910,2360 h60
  text "4" at 13559.84,2360 h60
  text "Bottom Overlay" at 11120.49,2240 h60
  text "Total board thickness:" at 10710.58,2120 h60
  text "1.590mm" at 12910,2120 h60
Drill Drawing:
  circle w10: c1678.06,5463.33 r33.33
  circle w10: c1678.06,4863.33 r20
  circle w10: c1678.06,4863.33 r33.33
  lines w10: 1644.73,4229.99 1711.4,4229.99 1711.4,4296.66 1644.73,4296.66 1644.73,4229.99 ; 1644.73,4413.33 1678.06,4379.99 1711.4,4413.33 1678.06,4446.66 1644.73,4413.33 ; 1644.73,4529.99 1678.06,4546.66 1711.4,4529.99 1694.73,4563.33 1711.4,4596.66 1678.06,4579.99 1644.73,4596.66 1661.4,4563.33 1644.73,4529.99 ; 1644.73,4679.99 1644.73,4696.66 1661.4,4713.33 1644.73,4729.99 1644.73,4746.66 1661.4,4746.66 1678.06,4729.99 1694.73,4746.66 1711.4,4746.66 1711.4,4729.99 1694.73,4713.33 1711.4,4696.66 1711.4,4679.99 1694.73,4679.99 1678.06,4696.66 1661.4,4679.99 1644.73,4679.99 ; 1644.73,4996.66 1661.4,4996.66 1678.06,4979.99 1694.73,4996.66 1711.4,4996.66 1694.73,5013.33 1711.4,5029.99 1694.73,5029.99 1678.06,5046.66 1661.4,5029.99 1644.73,5029.99 1661.4,5013.33 1644.73,4996.66 ; 1644.73,5146.66 1661.4,5146.66 1661.4,5129.99 1694.73,5129.99 1694.73,5146.66 1711.4,5146.66 1711.4,5179.99 1694.73,5179.99 1694.73,5196.66 1661.4,5196.66 1661.4,5179.99 1644.73,5179.99 1644.73,5146.66 ; 1644.73,5346.66 1711.4,5346.66 1678.06,5279.99 1644.73,5346.66 ; 1644.73,5579.99 1711.4,5579.99 1711.4,5646.66 1644.73,5646.66 1644.73,5579.99 ; 1658.06,4243.33 1698.06,4243.33 1698.06,4283.33 1658.06,4283.33 1658.06,4243.33
  lines w15: 1584.94,4184.99 9084.88,4184.99 ; 1584.94,5684.99 9084.88,5684.99 ; 2135.81,4034.99 2135.81,5834.99 ; 2725.66,4034.99 2725.66,5834.99 ; 3875.32,4034.99 3875.32,5834.99 ; 4381.2,4034.99 4381.2,5834.99 ; 5115,4034.99 5115,5834.99 ; 6614.55,4034.99 6614.55,5834.99 ; 7204.4,4034.99 7204.4,5834.99 ; 7950.2,4034.99 7950.2,5834.99 ; 1584.94,4034.99 9084.88,4034.99 9084.88,5834.99 1584.94,5834.99 1584.94,4034.99
  text "Symbol" at 1674.94,5729.99 h72
  text "Count" at 2180.81,5729.99 h72
  text "Hole Size" at 2770.66,5729.99 h72
  text "Plated" at 3920.32,5729.99 h72
  text "Hole Type" at 4426.2,5729.99 h72
  text "Drill Layer Pair" at 5160,5729.99 h72
  text "Via/Pad" at 6659.55,5729.99 h72
  text "Pad Shape" at 7249.4,5729.99 h72
  text "Template" at 7995.2,5729.99 h72
  text "2" at 2180.81,5579.99 h60
  text "0.600mm (23.62mil)" at 2770.66,5579.99 h60
  text "PTH" at 3920.32,5579.99 h60
  text "Slot" at 4426.2,5579.99 h60
  text "Top Layer - Bottom Layer" at 5160,5579.99 h60
  text "Pad" at 6659.55,5579.99 h60
  text "Rounded" at 7249.4,5579.99 h60
  text "r90_170h60_140r45" at 7995.2,5579.99 h60
  text "2" at 2180.81,5429.99 h60
  text "0.600mm (23.62mil)" at 2770.66,5429.99 h60
  text "PTH" at 3920.32,5429.99 h60
  text "Slot" at 4426.2,5429.99 h60
  text "Top Layer - Bottom Layer" at 5160,5429.99 h60
  text "Pad" at 6659.55,5429.99 h60
  text "Rounded" at 7249.4,5429.99 h60
  text "(Mixed)" at 7995.2,5429.99 h60
  text "2" at 2180.81,5279.99 h60
  text "0.620mm (24.41mil)" at 2770.66,5279.99 h60
  text "NPTH" at 3920.32,5279.99 h60
  text "Round" at 4426.2,5279.99 h60
  text "Top Layer - Bottom Layer" at 5160,5279.99 h60
  text "Pad" at 6659.55,5279.99 h60
  text "Rounded" at 7249.4,5279.99 h60
  text "c0hn62" at 7995.2,5279.99 h60
  text "4" at 2180.81,5129.99 h60
  text "0.810mm (31.89mil)" at 2770.66,5129.99 h60
  text "NPTH" at 3920.32,5129.99 h60
  text "Round" at 4426.2,5129.99 h60
  text "Top Layer - Bottom Layer" at 5160,5129.99 h60
  text "Pad" at 6659.55,5129.99 h60
  text "Rounded" at 7249.4,5129.99 h60
  text "c0hn81" at 7995.2,5129.99 h60
  text "4" at 2180.81,4979.99 h60
  text "0.950mm (37.40mil)" at 2770.66,4979.99 h60
  text "PTH" at 3920.32,4979.99 h60
  text "Round" at 4426.2,4979.99 h60
  text "Top Layer - Bottom Layer" at 5160,4979.99 h60
  text "Pad" at 6659.55,4979.99 h60
  text "(Mixed)" at 7249.4,4979.99 h60
  text "(Mixed)" at 7995.2,4979.99 h60
  text "8" at 2180.81,4829.99 h60
  text "3.100mm (122.05mil)" at 2770.66,4829.99 h60
  text "NPTH" at 3920.32,4829.99 h60
  text "Round" at 4426.2,4829.99 h60
  text "Top Layer - Bottom Layer" at 5160,4829.99 h60
  text "Pad" at 6659.55,4829.99 h60
  text "Rounded" at 7249.4,4829.99 h60
  text "c0hn310m10mx10p0" at 7995.2,4829.99 h60
  text "21" at 2180.81,4679.99 h60
  text "3.988mm (157.00mil)" at 2770.66,4679.99 h60
  text "NPTH" at 3920.32,4679.99 h60
  text "Round" at 4426.2,4679.99 h60
  text "Top Layer - Bottom Layer" at 5160,4679.99 h60
  text "Pad" at 6659.55,4679.99 h60
  text "Rounded" at 7249.4,4679.99 h60
  text "c0hn399p0" at 7995.2,4679.99 h60
  text "42" at 2180.81,4529.99 h60
  text "1.702mm (67.00mil)" at 2770.66,4529.99 h60
  text "NPTH" at 3920.32,4529.99 h60
  text "Round" at 4426.2,4529.99 h60
  text "Top Layer - Bottom Layer" at 5160,4529.99 h60
  text "Pad" at 6659.55,4529.99 h60
  text "Rounded" at 7249.4,4529.99 h60
  text "c0hn170p0" at 7995.2,4529.99 h60
  text "42" at 2180.81,4379.99 h60
  text "3.000mm (118.11mil)" at 2770.66,4379.99 h60
  text "NPTH" at 3920.32,4379.99 h60
  text "Round" at 4426.2,4379.99 h60
  text "Top Layer - Bottom Layer" at 5160,4379.99 h60
  text "Pad" at 6659.55,4379.99 h60
  text "Rounded" at 7249.4,4379.99 h60
  text "c0hn300p0" at 7995.2,4379.99 h60
  text "91" at 2180.81,4229.99 h60
  text "0.300mm (11.81mil)" at 2770.66,4229.99 h60
  text "PTH" at 3920.32,4229.99 h60
  text "Round" at 4426.2,4229.99 h60
  text "Top Layer - Bottom Layer" at 5160,4229.99 h60
  text "Via" at 6659.55,4229.99 h60
  text "Rounded" at 7249.4,4229.99 h60
  text "v60h30m0mx0" at 7995.2,4229.99 h60
  text "218 Total" at 2180.81,4079.99 h60
  text "Slot definitions :" at 1674.94,3935.02 h60
  text "Routed Path Length" at 2707.63,3935.02 h60
  text "= Calculated from tool start centre position to tool end centre position." at 3810.29,3935.02 h60
  text "Hole Length" at 2707.63,3835.05 h60
  text "= Routed Path Length + Tool Size = Slot length as defined in the PCB layout" at 3400.43,3835.05 h60

## Dimensions
9882,3200 to 9882,0 on Dimensions
0,3082 to 10000,3082 on Dimensions

## Text inside footprints (layer, text, board x,y; h text height)
LED1: Bottom Overlay "+" at 2810.08,3111.35 h19.68 r180; Bottom Overlay "-" at 2890.08,3111.34 h19.68 r180
LED2: Bottom Overlay "+" at 88.65,1575.43 h19.68 r270; Bottom Overlay "-" at 88.66,1655.43 h19.68 r270
LED3: Bottom Overlay "-" at 2771.31,88.66 h19.68; Bottom Overlay "+" at 2851.3,88.65 h19.68
LED4: Bottom Overlay "+" at 7182.01,88.65 h19.68; Bottom Overlay "-" at 7102.02,88.66 h19.68
LED5: Bottom Overlay "+" at 9911.34,1616.66 h19.68 r90; Bottom Overlay "-" at 9911.34,1536.66 h19.68 r90
LED6: Bottom Overlay "+" at 7140.79,3111.34 h19.68 r180; Bottom Overlay "-" at 7220.79,3111.34 h19.68 r180